# Altium PCB PCB_Batterie_ESP.PcbDoc
Units mm, origin at the board's own origin, x right, y up, seen from the top; angles counter-clockwise.
Board outline 34.7 x 27.4 mm, 4 copper layers (Top Layer, Layer 1, Layer 2, Bottom Layer), stack 0.603 mm thick; 20 components, 16 nets, 77 pads, 7 vias.
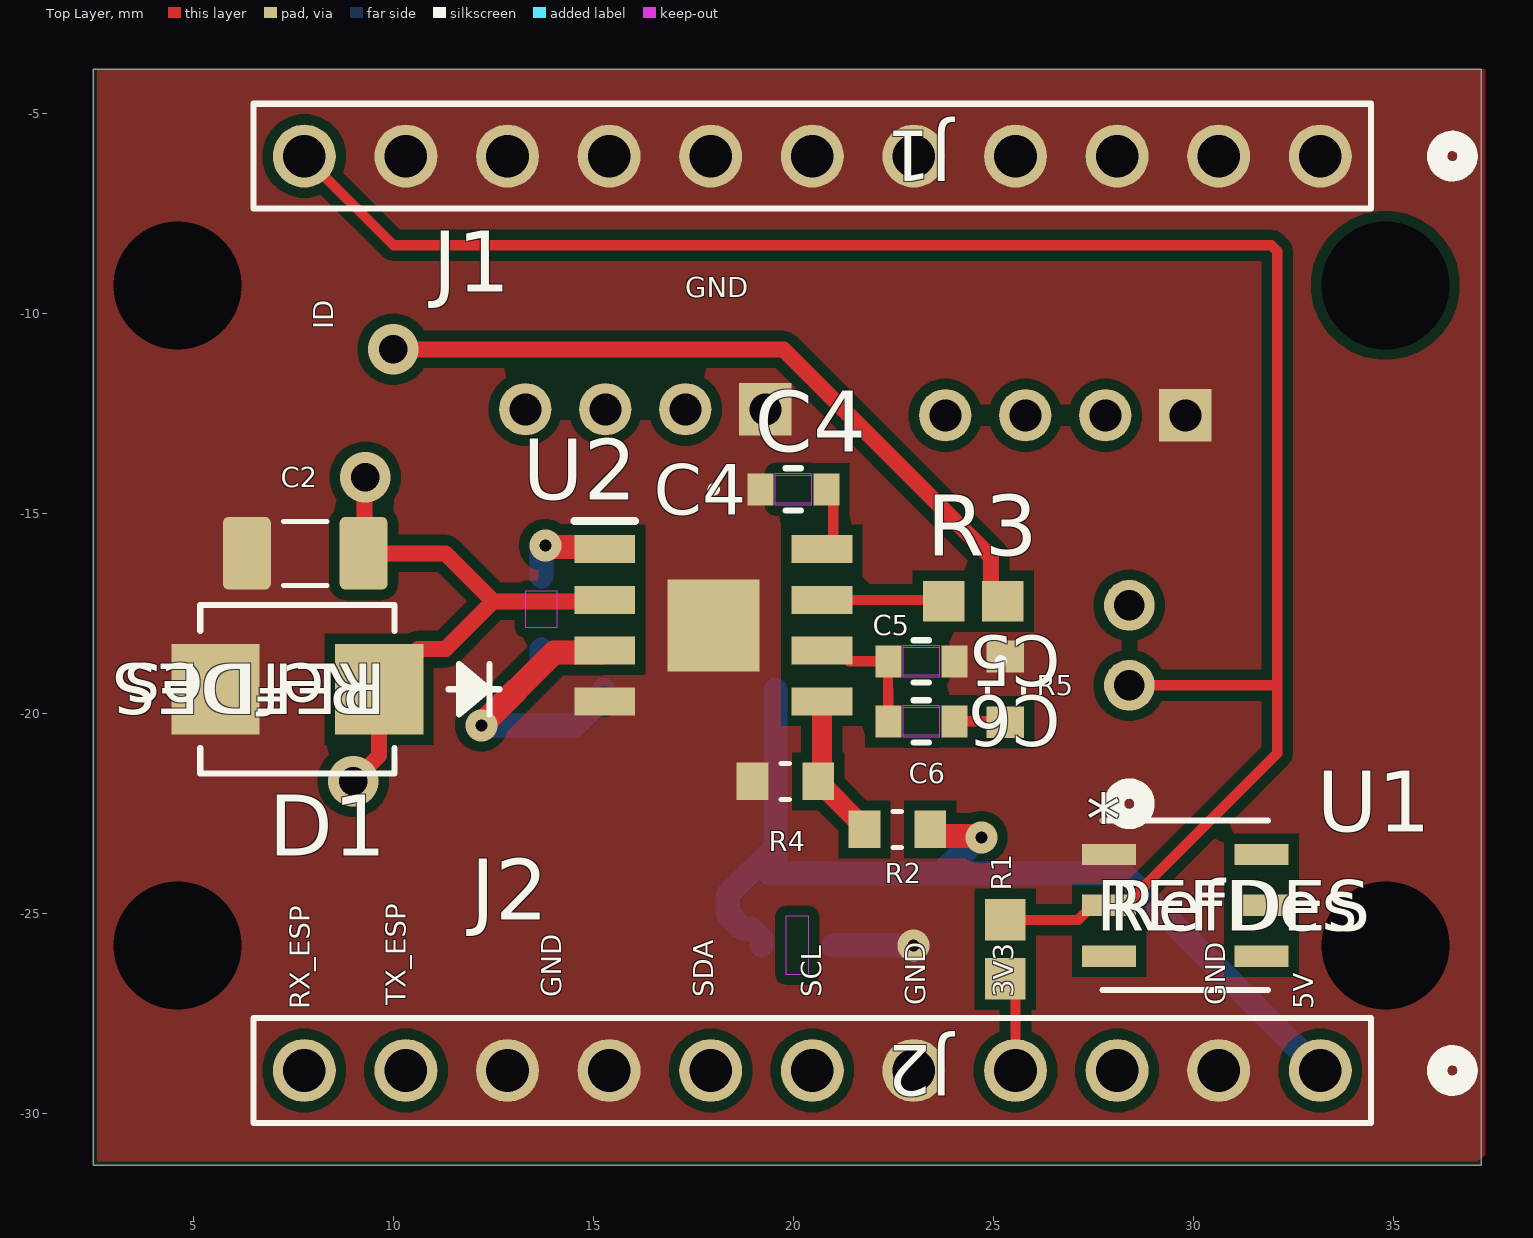
[diagram p0: Top Layer view]
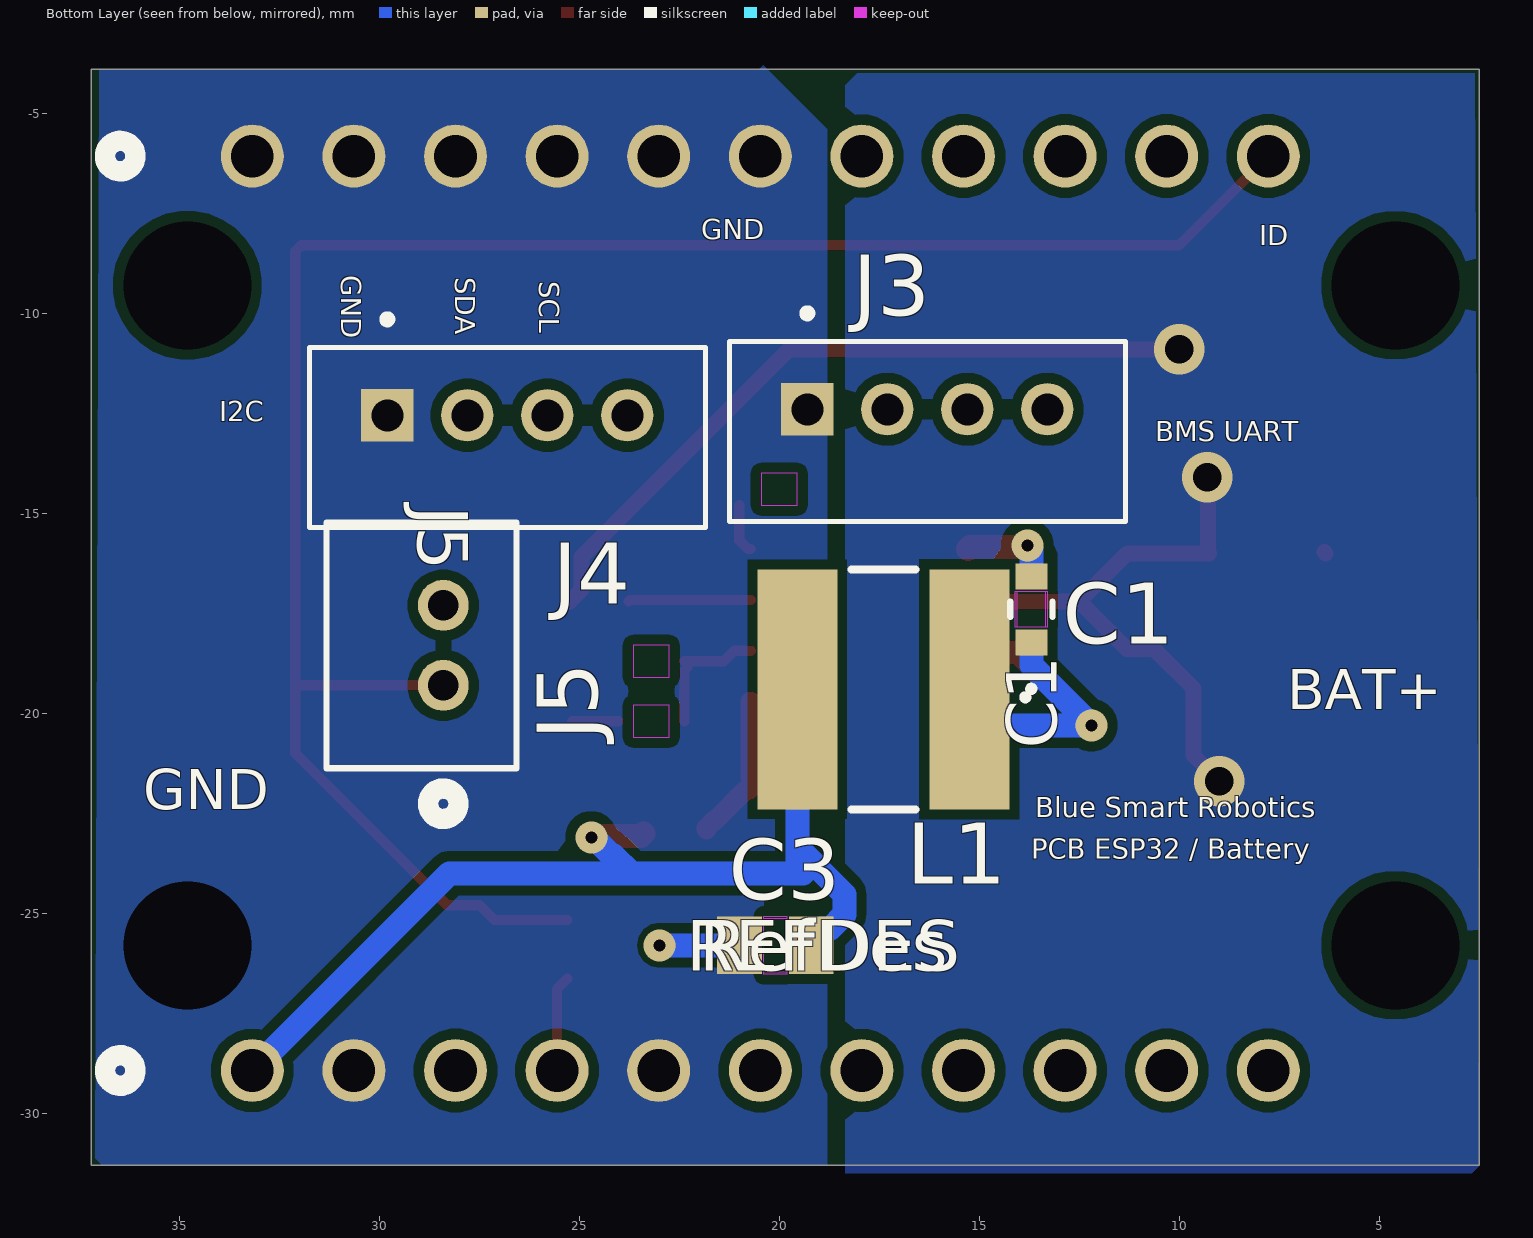
[diagram p1: Bottom Layer view, seen from below]
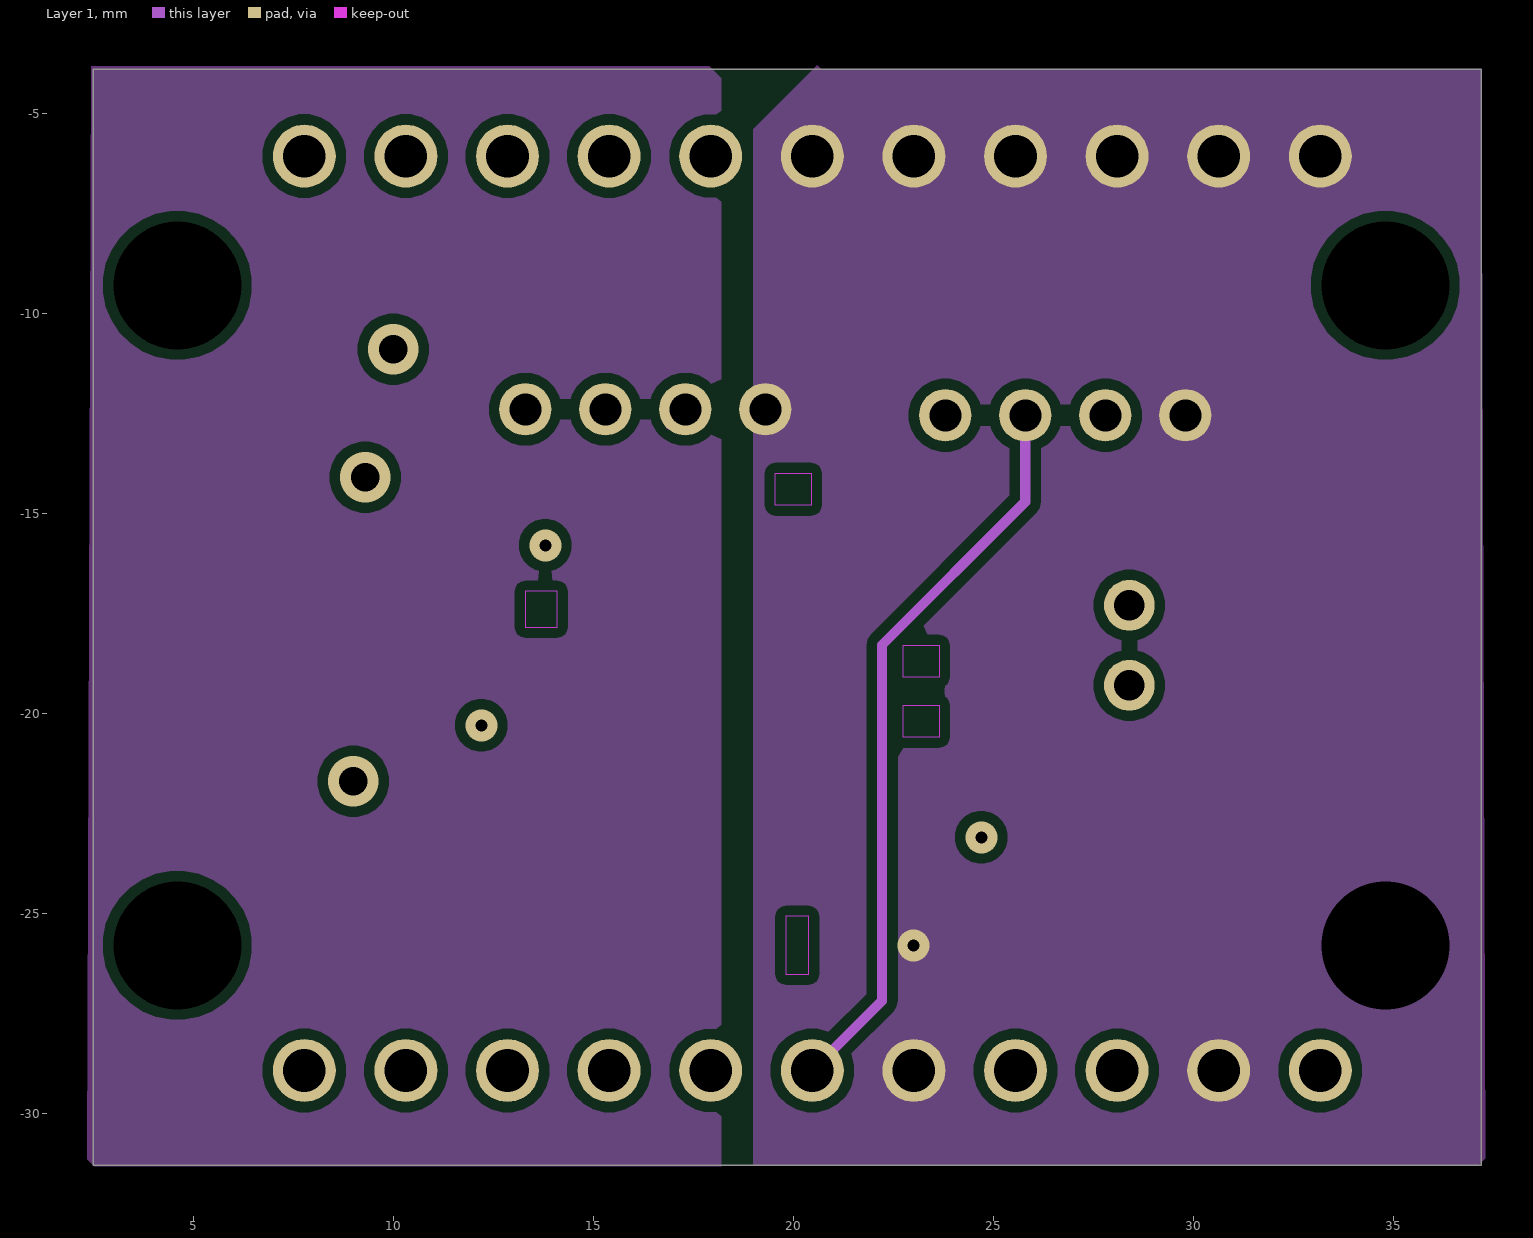
[diagram p2: Layer 1]
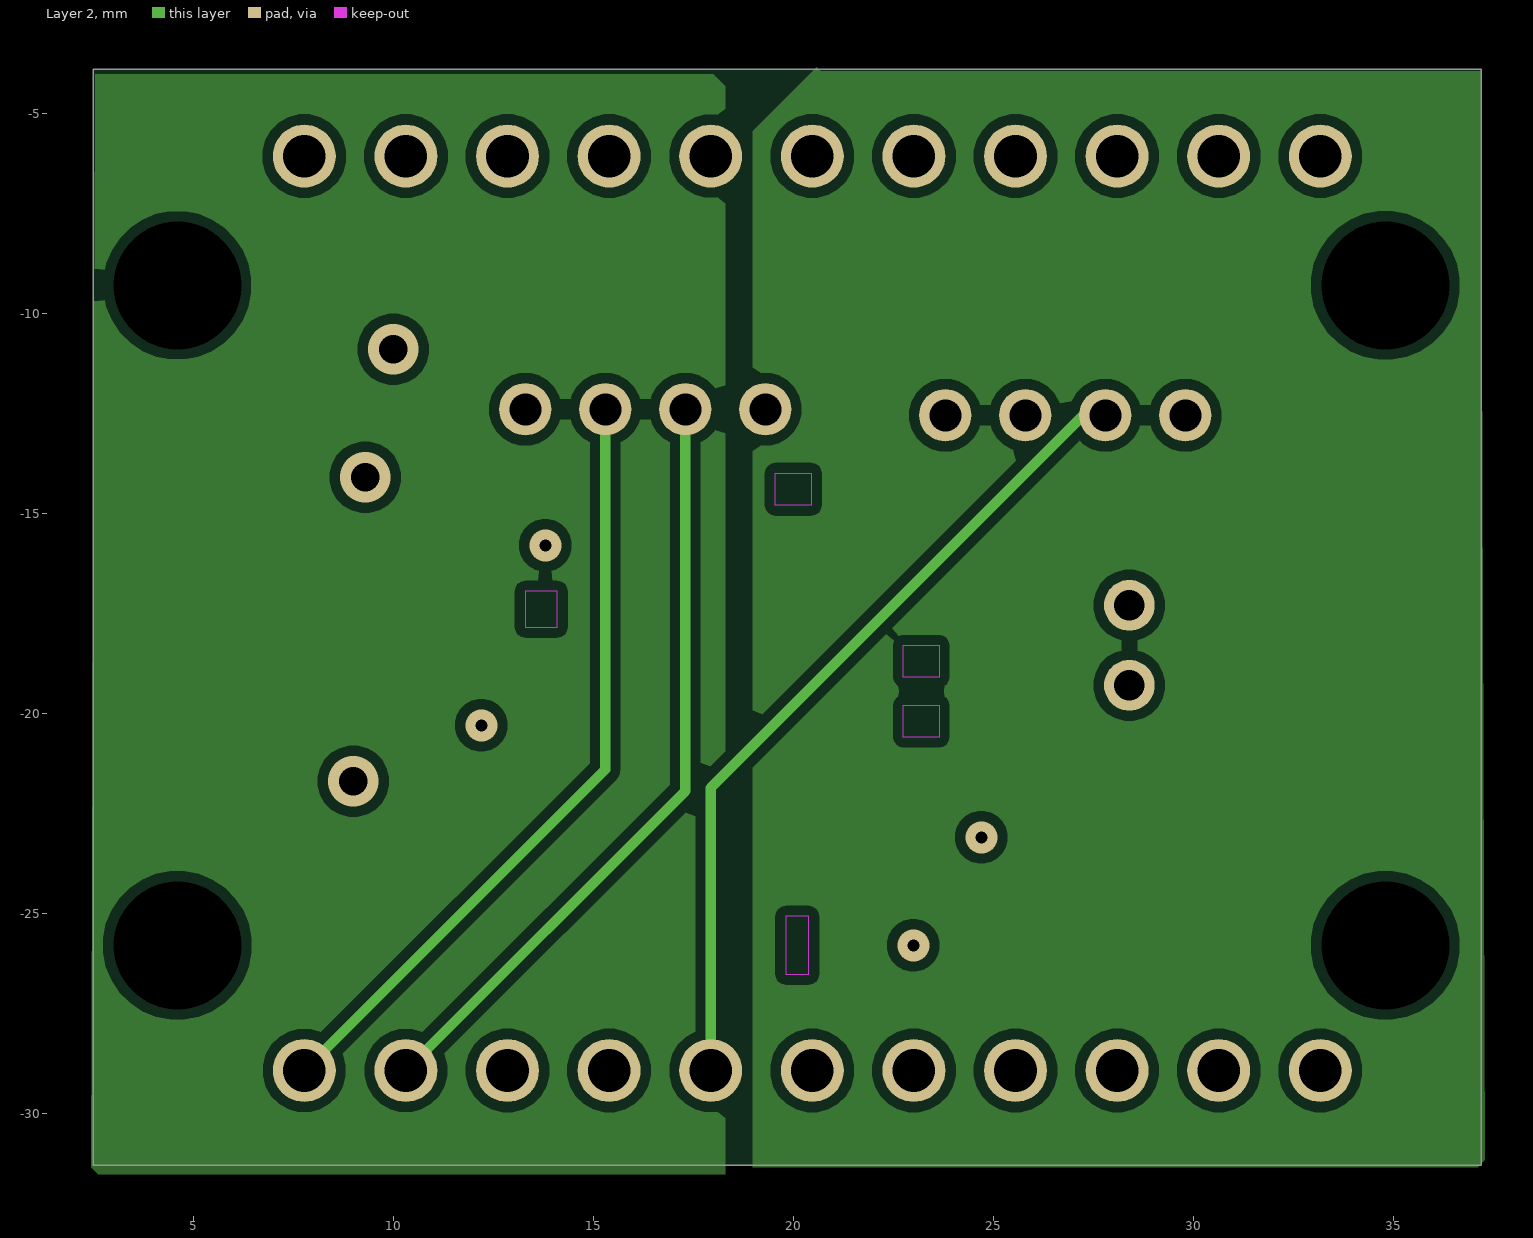
[diagram p3: Layer 2]
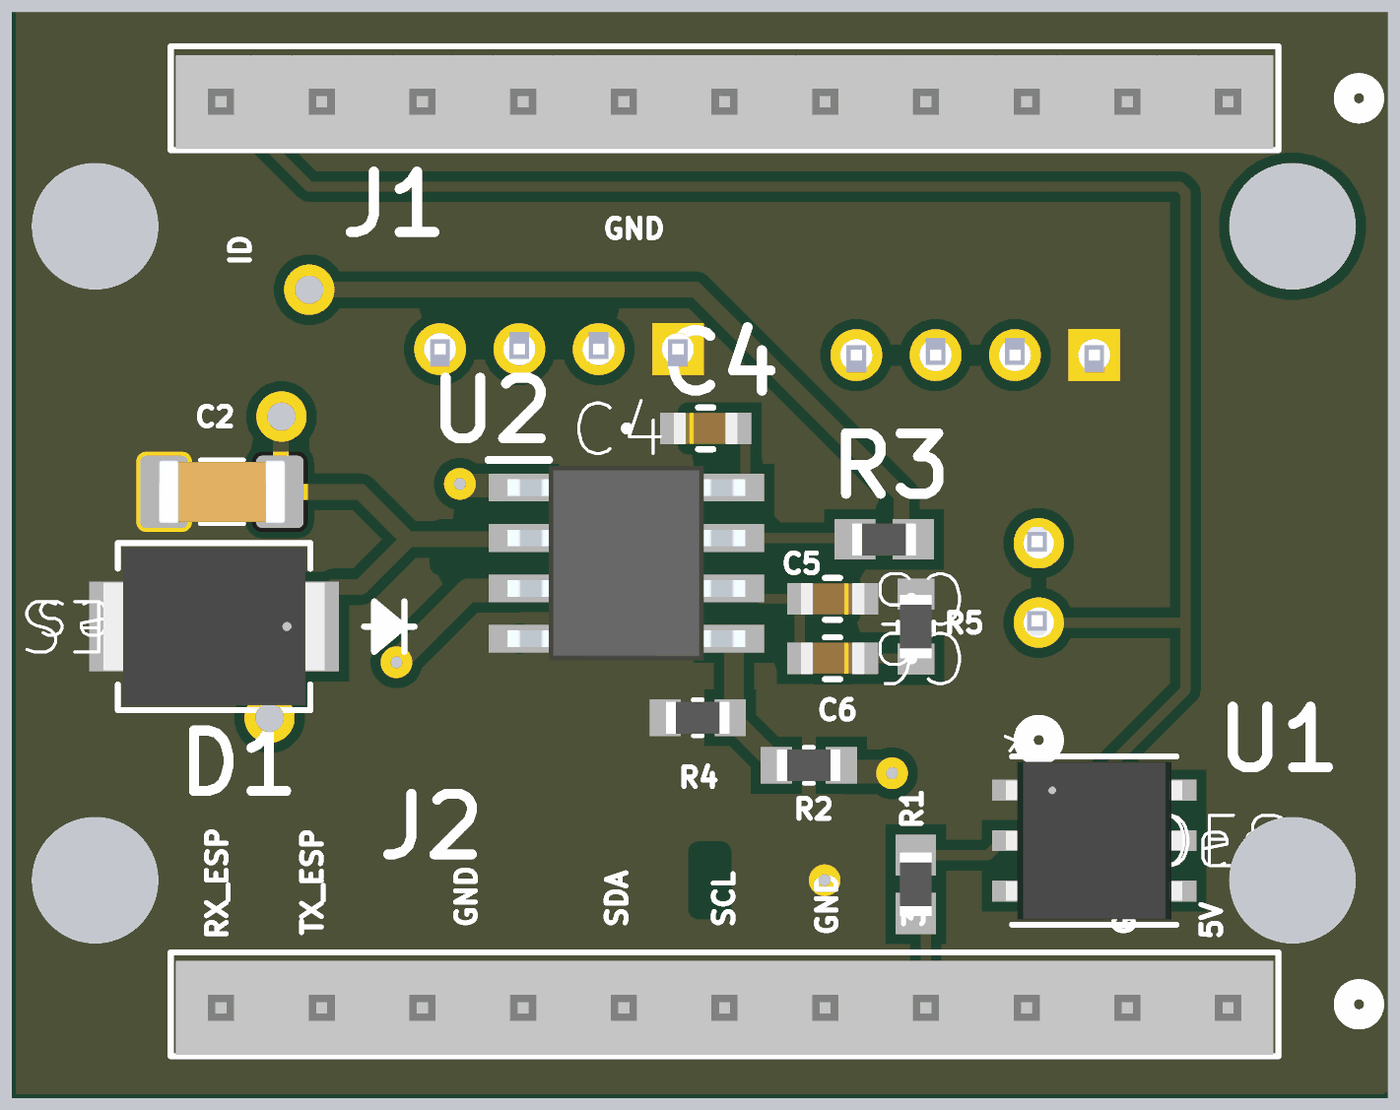
[diagram p4: 3D render of the assembled board from above, using the file's embedded part models]
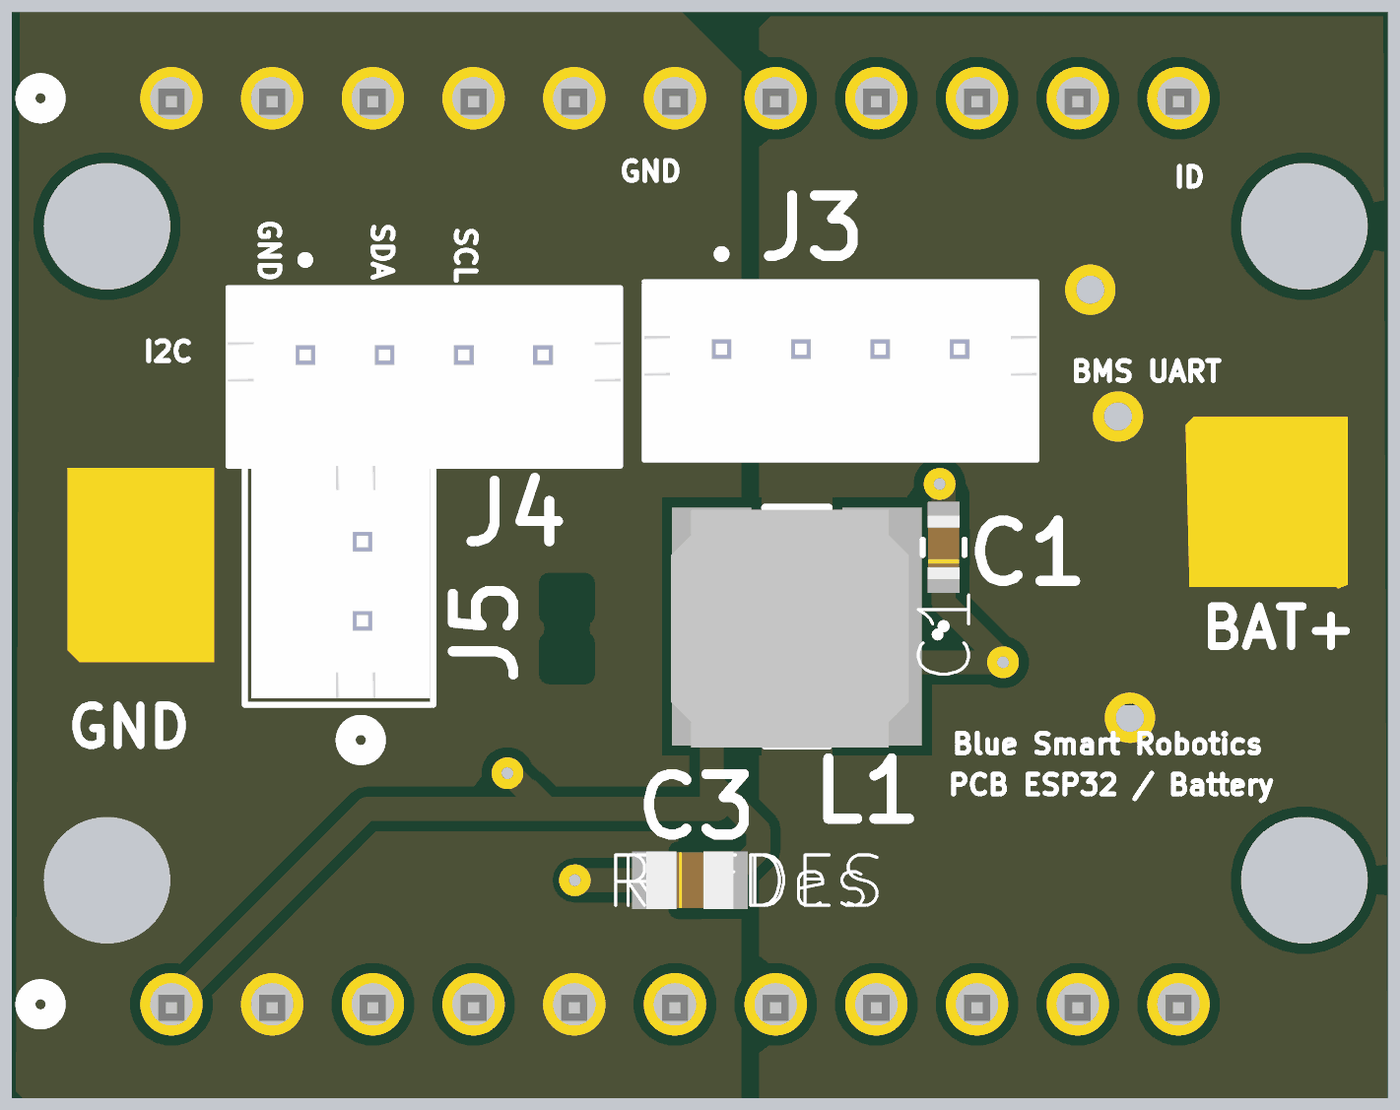
[diagram p5: 3D render of the assembled board from below, using the file's embedded part models]

## Layer stack, top to bottom
Top Solder: solder mask 0.0102, Solder Resist, Dk 3.5
Top Layer: signal copper 0.0356
Dielectric 2: prepreg 0.0711, PP-006, Dk 4.1
Layer 1: signal copper 0.035
Dielectric 1: dielectric 0.32, FR-4, Dk 4.8
Layer 2: signal copper 0.035
Dielectric 3: prepreg 0.0711, PP-006, Dk 4.1
Bottom Layer: signal copper 0.0356
Bottom Solder: solder mask 0.0102, Solder Resist, Dk 3.5

## Board outline
2.5,-31.3 2.5,-3.9 37.2,-3.9 37.2,-31.3

## Design rules (kind name [scope] priority, off if disabled: settings)
Clearance [All] p1: gap=0.254 ignorepadtopadclearanceinfootprint=FALSE
HoleSize [All] p1: absolutevalues=TRUE maxlimit=5 minlimit=0.025 maxpercent=80.000 minpercent=20.000
PolygonConnect [All] p1: connectstyle=Direct reliefconductorwidth=0.254 reliefentries=4 polygonreliefangle="90 Angle" airgapwidth=0.254
RoutingVias [All] p1: holewidth=0.711 width=1.27 viastyle="Through Hole" minholewidth=0.711 minwidth=1.27 maxholewidth=0.711 maxwidth=1.27
SolderMaskExpansion [All] p1: expansion=0 istentingtop=FALSE
SupplyNets "Schematic Supply Nets_3" [InNet('5V')] p1: voltage=0.000
SupplyNets "Schematic Supply Nets_2" [InNet('BAT+')] p2: voltage=0.000
SupplyNets "Schematic Supply Nets_1" [InNet('3V3')] p3: voltage=0.000
SupplyNets "Schematic Supply Nets" [InNet('GND')] p4: voltage=0.000
Width [All] p1: maxlimit=1 minlimit=0.254 preferedwidth=0.254 midlayer1_maxwidth=0.254 midlayer2_maxwidth=0.254 minimp=50.000000 maximp=50.000000 favimp=50.000000
29 further rules are at their usual default settings.

## Components (designator, comment, footprint, x,y, rotation, side; value= is the part's Value field where it differs from the comment)
C1 "0.1uF" CAP_CL10_SAM 13.7,-17.4 r90 bottom
C2 "4.7uF 50V" CAPC3216X180N 7.8,-16 r0 top
C3 "22uF 25V" CAP_CC0805_YAG 20.1,-25.8 r180 bottom
C4 "0.1uF" CAP_CL10_SAM 20,-14.4 r0 top
C5 "47pF" CAP_CL10_SAM 23.2,-18.7 r180 top
C6 "6.8nF" CAP_CL10_SAM 23.2,-20.2 r180 top
D1 "SMBJ58A" SMB_STM 7.6,-19.4 r180 top
J1 "22032111" CONN_SD-4030-0001_11_MOL 33.175,-6.07 r180 top
J2 "22032111" CONN_SD-4030-0001_11_MOL 33.175,-28.93 r180 top
J3 "B4B-PH-K-S" JST_B4B-PH-K-S 16.3,-12.95 r0 bottom
J4 "B4B-PH-K-S" JST_B4B-PH-K-S 26.8,-13.1 r0 bottom
J5 "B2B-PH-K-S" CONN2_B2B-PH-K-S_JST 28.4,-19.3 r270 bottom
L1 "SRN6045-101M" SRN6045101M 17.4,-19.4 r0 bottom
R1 "4.7k" RESC1607X60N 25.3,-25.9 r90 top
R2 "52.3k" RESC1608X55N 22.6,-22.9 r0 top
R3 "RC0603FR-07100KL" RESC1607X60N 24.5,-17.2 r180 top
R4 "10K" RESC1608X55N 19.8,-21.7 r0 top
R5 "24k" RESC1608X55N 25.3,-19.4 r270 top
U1 "DS2431P+" 21-0382_D6+1_MXM 29.8,-24.8 r0 top
U2 "RT6204GSP" SOIC127P600X175-9N 18,-17.8 r0 top

## Footprints (in the part's own frame and the unit in brackets; to place one, negate y for a bottom-side part, rotate by r counter-clockwise, add the part's x,y. Pads: shape width x height; smd on the part's side, far side on the other; paste and mask are expansions set on the pad)
21-0382_D6+1_MXM [mil]
  rect 53x21 smd paste+0 mask+0: 1(-75,50) 2(-75,0) 3(-75,-50) 4(75,-50) 5(75,0) 6(75,50)
  silkscreen extent -82,-84 82,84, body extent -88,-79 88,79, height 59
CAP_CC0805_YAG [mil]
  rect 44x57 smd paste+0 mask+0: 1(-35.31,0) 2(35.31,0)
  Top Layer keep-out region: -11.31,-26.5 -11.31,26.5 11.31,26.5 11.31,-26.5
  Keep-Out Layer region: -11.31,-28.5 -11.31,28.5 11.31,28.5 11.31,-28.5
  body extent -43,-29 43,29, height 57
CAP_CL10_SAM [mm]
  rect 0.65x0.8 smd paste+0 mask+0: 1(-0.825,0) 2(0.825,0)
  Top Layer keep-out region: -0.449,-0.349 -0.449,0.349 0.449,0.349 0.449,-0.349
  Keep-Out Layer region: -0.449,-0.4 -0.449,0.4 0.449,0.4 0.449,-0.4
  silkscreen extent -2.06,-0.53 0.19,0.53, body extent -0.8,-0.4 0.8,0.4, height 0.9
CAPC3216X180N [mm]
  rrect25% 1.2x1.82 smd paste+0 mask+0.102: 1(-1.46,0) 2(1.46,0)
  silkscreen extent -0.54,-0.8 0.54,0.8, body extent -1.6,-0.8 1.6,0.8, height 1.8
CONN2_B2B-PH-K-S_JST [mil]
  round 50 hole 30 paste-99999 mask+0: 1(0,0) 2(-78.74,0)
  silkscreen extent -160,-115 132,72, body extent -157,-109 75,69, height 236
CONN_SD-4030-0001_11_MOL [mil]
  round 62 hole 42 paste-99999 mask+0: 1(0,0) 2(100,0) 3(200,0) 4(300,0) 5(400,0) 6(500,0) 7(600,0) 8(700,0) 9(800,0) 10(900,0) 11(1000,0)
  silkscreen extent -145,-52 1050,52, body extent -45,-43 1045,50, height 411
JST_B4B-PH-K-S [mm]
  rect 1.308x1.308 / inner round 1.308 / far side rect 1.308x1.308 hole 0.8: 1(3,-0.55)
  round 1.308 hole 0.8: 2(1,-0.55) 3(-1,-0.55) 4(-3,-0.55)
  silkscreen extent -4.95,-3.05 4.95,2.25, body extent -4.95,-2.25 4.95,2.25, height 5.8
RESC1607X60N [mm]
  rect 1.04x1.02 smd: 1(-0.735,0) 2(0.735,0)
  body extent -0.8,-0.4 0.8,0.4, height 0.55
RESC1608X55N [mm]
  rect 0.79x0.93 smd: 1(-0.82,0) 2(0.82,0)
  silkscreen extent -0.11,-0.45 0.11,0.45, body extent -0.8,-0.4 0.8,0.4, height 0.55
SMB_STM [mil]
  rect 87x89 smd paste+0 mask+0: 1(-80.5,0) 2(80.5,0)
  silkscreen extent -199,-83 96,83, body extent -110,-78 110,78, height 104
SOIC127P600X175-9N [mm]
  rect 1.522x0.7 smd: 1(-2.714,1.905) 2(-2.714,0.635) 3(-2.714,-0.635) 4(-2.714,-1.905) 5(2.714,-1.905) 6(2.714,-0.635) 7(2.714,0.635) 8(2.714,1.905)
  rect 2.3x2.3 smd: 9(0,0)
  silkscreen extent -3.47,2.61 -1.95,2.61, body extent -3,-2.45 3,2.45, height 1.75
SRN6045101M [mm]
  rect 2x6 smd: 1(-2.15,0) 2(2.15,0)
  silkscreen extent -3.6,-3 0.8,3, body extent -2.82,-2.95 3.17,3.05, height 4

## Part data
C1 C4: library part CL10B104JB8NNNC, "CAP CER 0.1UF 50V X7R 0603", Manufacturer_Name=Samsung, Copyright="Copyright (C) 2025 Ultra Librarian. All rights reserved.", Manufacturer_Part_Number=CL10B104JB8NNNC
C2: library part CL31B475KBHNFNE, "4.7 ÂµF Â±10% 50V Ceramic Capacitor X7R 1206 (3216 Metric)", Package="SMD-2 Samsung", Check_prices=https://www.snapeda.com/parts/CL31B475KBHNFNE/Samsung/view-part/?ref=eda, MF=Samsung, MP=CL31B475KBHNFNE, SnapEDA_Link=https://www.snapeda.com/parts/CL31B475KBHNFNE/Samsung/view-part/?ref=snap
C3: library part CC0805MKX5R8BB226, "CAP CER 22UF 25V X5R 0805", Manufacturer_Name=Yageo, Copyright="Copyright (C) 2025 Ultra Librarian. All rights reserved.", Manufacturer_Part_Number=CC0805MKX5R8BB226
C5: library part CL10C470JB8NNNC, "CAP CER 47PF 50V C0G/NP0 0603", Manufacturer_Name=Samsung, Copyright="Copyright (C) 2025 Ultra Librarian. All rights reserved.", Manufacturer_Part_Number=CL10C470JB8NNNC
C6: library part CL10B682JB8NNNC, "CAP CER 6.8nF 50V X7R 0603", Manufacturer_Name=Samsung, Copyright="Copyright (C) 2026 Ultra Librarian. All rights reserved.", Manufacturer_Part_Number=CL10B682JB8NNNC
D1: "TVS DIODE 58VWM 93.6VC DO214AA", Manufacturer_Name=STMicroelectronics, Copyright="Copyright (C) 2025 Ultra Librarian. All rights reserved.", Manufacturer_Part_Number=SMBJ58A
J1 J2: "KK 254 Wire-to-Board Header, Single Row, Vertical, 11 Circuits, PA Polyamide Nylon, Tin (Sn) Plating", Manufacturer_Name="Molex Connector Corporation", Copyright="Copyright (C) 2025 Ultra Librarian. All rights reserved.", Manufacturer_Part_Number=22032111, RefDes=RefDes, Type="Headers, Male Pins"
J3 J4: Package=None, Availability=Unavailable, MF="{'manufacturer': u'JST Sales America Inc.'}", MP=B4B-PH-K-S, Price=None
J5: "Description", Manufacturer_Name=JST, Copyright="Copyright (C) 2026 Ultra Librarian. All rights reserved.", Manufacturer_Part_Number=B2B-PH-K-S, RefDes=RefDes, Type=Type
L1: "Bourns SRN6045 Series Shielded Wire-wound SMD Inductor with a Ferrite Core, 100 uH +/-20% 0.8A Idc", Manufacturer_Name=Bourns, Mouser Part Number=652-SRN6045-101M, Datasheet Link=http://www.bourns.com/docs/Product-Datasheets/SRN6045.pdf, Geometry.Height=4.5mm, Manufacturer_Part_Number=SRN6045-101M, Mouser Price/Stock=https://www.mouser.co.uk/ProductDetail/Bourns/SRN6045-101M?qs=opBjA1TV9030ahoS0FyAMQ%3D%3D
R1: library part RC0603FR-074K7L, "Surface Mount Thick Film Resistor, RC Series, 4.7 kohm, 100 mW, - 1%, 50 V, 0603 [1608 Metric] RoHS Compliant: Yes", Package="0603-2 YAGEO", Check_prices=https://www.snapeda.com/parts/RC0603FR074K7L/Yageo/view-part/?ref=eda, MF="Yageo Corporation", MP=RC0603FR074K7L, SnapEDA_Link=https://www.snapeda.com/parts/RC0603FR074K7L/Yageo/view-part/?ref=snap
R2: library part RC0603FR-0752K3L, "YAGEO (PHYCOMP) RC0603 F", Manufacturer_Name="Yageo Group", Mouser Part Number=603-RC0603FR-0752K3L, Datasheet Link=http://www.yageo.com/documents/recent/PYu-RC0603_51_RoHS_L_v5.pdf, Geometry.Height=0.55mm, Manufacturer_Part_Number=RC0603FR-0752K3L, Mouser Price/Stock=https://www.mouser.co.uk/ProductDetail/YAGEO/RC0603FR-0752K3L?qs=gt6vzsuosg1%252BFdjgr%2FxeWg%3D%3D
R3: "100 kOhms Â±1% 0.1W, 1/10W Chip Resistor 0603 (1608 Metric) Moisture Resistant Thick Film", Package="0603 Yageo", Check_prices=https://www.snapeda.com/parts/RC0603FR-07100KL/Yageo/view-part/?ref=eda, MF=Yageo, MP=RC0603FR-07100KL, SnapEDA_Link=https://www.snapeda.com/parts/RC0603FR-07100KL/Yageo/view-part/?ref=snap
R4: library part RC0603FR-0710KL, "Yageo RC Series Thick Film Surface Mount Resistor 0603 Case 10k", Manufacturer_Name="Yageo Group", Mouser Part Number=603-RC0603FR-0710KL, Datasheet Link=http://www.yageo.com/documents/recent/PYu-RC0603_51_RoHS_L_v5.pdf, Geometry.Height=0.55mm, Manufacturer_Part_Number=RC0603FR-0710KL, Mouser Price/Stock=https://www.mouser.co.uk/ProductDetail/YAGEO/RC0603FR-0710KL?qs=grNVn54RoB%252B3GtjbJj3wJQ%3D%3D
R5: library part RC0603FR-0724KL, "Yageo 24k, 0603 (1608M) Thick Film SMD Resistor +/-1% 0.1 W, 0.2 W - RC0603FR-0724KL", Manufacturer_Name="Yageo Group", Mouser Part Number=603-RC0603FR-0724KL, Datasheet Link=https://www.yageo.com/upload/media/product/productsearch/datasheet/rchip/PYu-RC_Group_51_RoHS_L_12.pdf, Geometry.Height=0.55mm, Manufacturer_Part_Number=RC0603FR-0724KL, Mouser Price/Stock=https://www.mouser.co.uk/ProductDetail/YAGEO/RC0603FR-0724KL?qs=NUn4zLqw%2FjL4A5exBX9GHg%3D%3D
U1: "EEPROM Memory IC 1Kb (256 x 4) 1-WireÂ® 2Âµs 6-TSOC", Package="TSOC-6 Maxim", Availability=Warning, MF="Maxim Integrated", MP=DS2431P+, Price=None, Purchase-URL=https://pricing.snapeda.com/search/part/DS2431P+/?ref=eda, SnapEDA_Link=https://www.snapeda.com/parts/DS2431P+/Maxim%20Integrated/view-part/479429/?ref=snap
U2: "Switching Voltage Regulators 500mA, 60V, 350kHz Synchronous Step-Down Converter", Manufacturer_Name=RICHTEK, Datasheet Link=https://4donline.ihs.com/images/VipMasterIC/IC/RHTK/RHTK-S-A0013504612/RHTK-S-A0013505728-1.pdf?hkey=61A2E4C270F0397D049F8F05BD4F1054, Geometry.Height=1.753mm, Manufacturer_Part_Number=RT6204GSP

## Free pads (board coordinates)
  round 0 hole 3.2 unplated: 2(4.6,-25.8) 2(4.6,-9.3) 2(34.8,-25.8) 2(34.8,-9.3)

## Via types
v1: diameter 0.8, hole 0.3, Top Layer to Bottom Layer, 4 vias
v2: diameter 1.27, hole 0.711, Top Layer to Bottom Layer, 3 vias

## Nets (pads, with @x,y where several pads share a name; then routed paths per layer and width w, separated by ;. In a path a pad name is that pad's centre, name@x,y a point inside that pad or via, vN(x,y) a via of type N, cw(c..) or ccw(c..) an arc to the next point about the centre after c; other vN are vias at no path point)
3V3: J2.4 R1.1 | length 2.4
  Top Layer w0.254: R1.1 25.555,-26.89 J2.4
5V: C3.2 J2.1 L1.2 R2.2 | length 26.6
  Top Layer w0.6: R2.2@23.4,-23 23.462,-23.062 24.662,-23.062 v1(24.7,-23.1)
  Bottom Layer w0.6: C3.2 19.203,-25.635 18.944,-25.376 18.724,-25.376 18.372,-25.025 18.372,-24.528 19.55,-23.35 ; L1.2 19.55,-23.35 ; v1(24.7,-23.1) 24.646,-23.1 24.201,-23.545 24.155,-23.545 23.7,-24 ; J2.1 28.245,-24 23.7,-24 ; 19.55,-23.35 19.55,-23.856 19.406,-24 23.7,-24
BAT+: C2.2 D1.1 R3.1 U2.2 | length 33.1
  Top Layer w0.4: v2(9,-21.7) 9.645,-21.055 D1.1 ; v2(9.3,-14.1) 9.28,-14.12 9.28,-15.98 C2.2 11.3,-16 12.5,-17.2 ; D1.1@9.645,-19.375 10.623,-18.397 11.303,-18.397 12.5,-17.2 ; v2(10,-10.9) 19.75,-10.9 24.94,-16.09 24.94,-16.905 R3.1 ; U2.2 15.251,-17.2 12.5,-17.2
BMS_RX: J2.10 J3.2 | length 19.4
  Layer 2 w0.254: J2.10 17.3,-21.945 J3.2
BMS_TX: J2.11 J3.3 | length 19.6
  Layer 2 w0.254: J2.11 15.3,-21.405 J3.3
GND: C2.1 C3.1 C4.1 C5.1 D1.2 J1.1 J1.2 J1.3 J1.4 J1.5 J1.6 J1.7 J1.8 J1.9 J1.10 J2.2 J2.5 J2.8 J2.9 J3.1 J4.1 pad.2@4.6,-9.3 pad.2@4.6,-25.8 pad.2@34.8,-25.8 R4.1 R5.1 U1.1 U2.4 U2.9 | length 2
  Top Layer w0.254: U2.4 U2.4@15.288,-19.703
  Top Layer w0.4: C2.1 C2.1@6.37,-15.97
  Bottom Layer w0.6: C3.1 v1(23,-25.8)
ID: J1.11 J5.1 R1.2 U1.2 | length 50.1
  Top Layer w0.254: J1.11 10.005,-8.3 31.951,-8.3 32.1,-8.449 32.1,-19.3 ; R1.2 27.124,-25.165 27.489,-24.8 U1.2 28.301,-24.8 32.1,-21.001 32.1,-19.3 ; J5.1 32.1,-19.3
NetC1_1: C1.1 L1.1 U2.3 | length 9.9
  Top Layer w0.6: v1(12.2,-20.3) 14.015,-18.485 15.236,-18.485 U2.3
  Bottom Layer w0.6: C1.1@13.7,-18.403 13.7,-18.8 v1(12.2,-20.3) 14.55,-20.3 15.25,-19.6 L1.1
NetC1_2: C1.2 U2.1 | length 2.3
  Top Layer w0.6: v1(13.8,-15.8) 13.854,-15.8 13.899,-15.845 15.236,-15.845 U2.1
  Bottom Layer w0.6: C1.2 13.7,-15.9 v1(13.8,-15.8)
NetC4_2: C4.2 U2.8 | length 1.3
  Top Layer w0.254: U2.8 20.777,-15.895 21,-15.672 21,-14.8
NetC5_2: C5.2 C6.2 U2.6 | length 3.2
  Top Layer w0.254: U2.6 21.125,-18.435 21.39,-18.7 C5.2 ; C5.2@22.295,-18.849 22.37,-18.924 22.37,-19.414 22.375,-19.419 C6.2
NetC6_1: C6.1 R5.2 | length 1.2
  Top Layer w0.254: C6.1 R5.2@25.18,-20.2
NetR2_1: R2.1 R4.2 U2.5 | length 3.7
  Top Layer w0.5: R4.2 20.62,-21.77 20.765,-21.915 20.835,-21.915 21.605,-22.685 21.635,-22.685 21.82,-22.87 R2.1@21.82,-22.9 ; R4.2@20.714,-21.606 U2.5
NetR3_2: R3.2 U2.7 | length 3.1
  Top Layer w0.254: U2.7 23.73,-17.165 R3.2
SCL: J2.6 J4.3 | length 18.6
  Layer 1 w0.254: J2.6 22.219,-27.186 22.219,-18.293 25.8,-14.712 J4.3
SDA: J2.7 J4.2 | length 20.6
  Layer 2 w0.254: J2.7 17.935,-21.865 J4.2@27.525,-12.275
pads on no net: J2.3 J3.4 J4.4 J5.2 U1.3 U1.4 U1.5 U1.6
copper on no net: | length 0

## Polygon pours and split planes (outlines as drawn)
GND on Bottom Layer "GND_L04_P008" (solid, pour order 8): 37,-3.9 20.5,-3.9 20.4,-3.8 18.8,-5.4 18.8,-31.3 37.1,-31.3
BAT+ on Bottom Layer "BAT+_L04_P003" (solid, pour order 3): 2.608,-3.999 18.056,-3.999 18.356,-4.299 18.356,-31.499 2.507,-31.499
no net on Bottom Solder "NONET_L-01_P-001" (solid): 35.8,-15.4 32.1,-15.4 32.1,-20.3 35.5,-20.3 35.8,-20
no net on Bottom Solder "NONET_L-01_P-001" (solid): 7.6,-14.2 7.5,-14.1 3.5,-14.1 3.5,-18.5 3.6,-18.6 3.8,-18.4 7.5,-18.4
no net on Layer 2 "NONET_L03_P007" (solid, pour order 7): 37.191,-3.945 20.691,-3.945 20.591,-3.845 18.991,-5.445 18.991,-31.345 37.291,-31.345
no net on Layer 2 "NONET_L03_P006" (solid, pour order 6): 2.55,-4.023 17.998,-4.023 18.298,-4.323 18.298,-31.523 2.449,-31.523
GND on Layer 1 "GND_L02_P004" (solid, pour order 4): 37.2,-3.9 20.7,-3.9 20.6,-3.8 19,-5.4 19,-31.3 37.3,-31.3
no net on Layer 1 "NONET_L02_P005" (solid, pour order 5): 2.45,-3.823 17.898,-3.823 18.198,-4.123 18.198,-31.323 2.349,-31.323
GND on Top Layer "GND_L01_P002" (solid, pour order 2): 2.6,-3.9 37.3,-3.9 37.3,-31.2 37.2,-31.3 37.1,-31.2 2.6,-31.2

## Silkscreen, mask and mechanical layers (free items; w line width, h text height)
Top Overlay:
  text "GND" at 17.3,-9.6 h0.5
  text "ID" at 8.5,-10.4 h0.5 r90
  text "GND" at 14.2,-27.1 h0.5 r90
  text "SDA" at 18,-27.1 h0.5 r90
  text "SCL" at 20.7,-27.1 h0.5 r90
  text "3V3" at 25.5,-27.1 h0.5 r90
  text "TX_ESP" at 10.317,-27.3 h0.5 r90
  text "GND" at 23.3,-27.3 h0.5 r90
  text "GND" at 30.8,-27.3 h0.5 r90
  text "RX_ESP" at 7.917,-27.4 h0.5 r90
  text "5V" at 33,-27.4 h0.5 r90
Bottom Overlay:
  text "GND" at 21.95,-8.15 h0.5
  text "ID" at 8,-8.3 h0.5
  text "GND" at 30.95,-9.05 h0.5 r90
  text "SDA" at 28.1,-9.1 h0.5 r90
  text "SCL" at 26,-9.2 h0.5 r90
  text "I2C" at 34,-12.7 h0.5
  text "BMS UART" at 10.6,-13.2 h0.5
  text "BAT+" at 7.3,-19.9 h1
  text "GND" at 35.9,-22.4 h1
  text "Blue Smart Robotics" at 13.6,-22.6 h0.5
  text "PCB ESP32 / Battery" at 13.7,-23.633 h0.5
Mechanical 1:
  the board outline again, w0.254
Mechanical 13:
  lines w0.254: -0.508,-15.976 0,-17.5 ; -0.508,-1.524 0,0 ; -0.254,-17.5 0.254,-17.5 ; -0.254,0 0.254,0 ; 0,-35.254 0,-34.746 ; 0,-15.123 0,-17.5 ; 0,-2.377 0,0 ; 0.508,-15.976 0,-17.5 ; 0.508,-1.524 0,0 ; 0.75,0.496 0.75,1.004 ; 1.524,-35.508 0,-35 ; 1.524,-34.492 0,-35 ; 2.274,0.242 0.75,0.75 ; 2.274,1.258 0.75,0.75 ; 4.49,0.75 0.75,0.75 ; 4.75,-35 0,-35 ; 17.75,-35 22.5,-35 ; 18.76,0.75 22.5,0.75 ; 20.976,-35.508 22.5,-35 ; 20.976,-34.492 22.5,-35 ; 20.976,0.242 22.5,0.75 ; 20.976,1.258 22.5,0.75 ; 22.5,-35.254 22.5,-34.746 ; 22.5,0.496 22.5,1.004 ; 30.63,0 33.17,0 ; 31.646,-0.508 33.17,0 ; 31.646,0.508 33.17,0 ; 33.17,-0.254 33.17,0.254 ; 44.492,-30.454 45,-28.93 ; 44.492,-15.976 45,-17.5 ; 44.746,-28.93 45.254,-28.93 ; 44.746,-17.5 45.254,-17.5 ; 45,-31.47 45,-28.93 ; 45,-14.96 45,-17.5 ; 45,-0.254 45,0.254 ; 45.508,-30.454 45,-28.93 ; 45.508,-15.976 45,-17.5 ; 46.524,-0.508 45,0 ; 46.524,0.508 45,0 ; 46.767,-19.024 47.275,-17.5 ; 46.767,-4.546 47.275,-6.07 ; 47.021,-17.5 47.529,-17.5 ; 47.021,-6.07 47.529,-6.07 ; 47.275,-20.04 47.275,-17.5 ; 47.275,-3.53 47.275,-6.07 ; 47.54,0 45,0 ; 47.783,-19.024 47.275,-17.5 ; 47.783,-4.546 47.275,-6.07
  text "21.75 (mm)" at 4.744,-0.164 h1.52
  text "11.83 (mm)" at 32.331,-3.657 h1.52
  text "17.5 (mm)" at 0.914,-14.869 h1.52 r90
  text "11.43 (mm)" at 50.932,-18.539 h1.52 r90
  text "11.43 (mm)" at 48.657,-29.969 h1.52 r90
  text "22.5 (mm)" at 5.004,-35.914 h1.52

## Dimensions
2.5,-31.3 to 45,-36 on Mechanical 13

## Text inside footprints (layer, text, board x,y; h text height)
C3: Mechanical 13 "RefDes2" at 22.323,-26.435 h1.27; Bottom Overlay "REFDES" at 22.323,-26.435 h1.27; Bottom Overlay "RefDes" at 22.005,-26.435 h1.27
D1: Mechanical 13 "RefDes2" at 9.823,-18.765 h1.27 r180; Top Overlay "RefDes" at 9.505,-18.765 h1.27 r180; Top Overlay "REFDES" at 9.823,-18.765 h1.27 r180
U1: Mechanical 13 "*" at 28.085,-24.267 h1.27; Mechanical 13 "RefDes2" at 27.577,-25.435 h1.27; Top Overlay "REFDES" at 27.577,-25.435 h1.27; Top Overlay "*" at 27.323,-23.263 h1.27; Top Overlay "RefDes" at 27.895,-25.435 h1.27